# Altium PCB PCB1.PcbDoc
Units mm, origin at the board's own origin, x right, y up, seen from the top; angles counter-clockwise.
Board outline 130 x 71 mm, 2 copper layers (Top Layer, Bottom Layer); 54 components, 60 nets, 381 pads, 527 vias.
Unrouted connection lines stored in the file: 34.
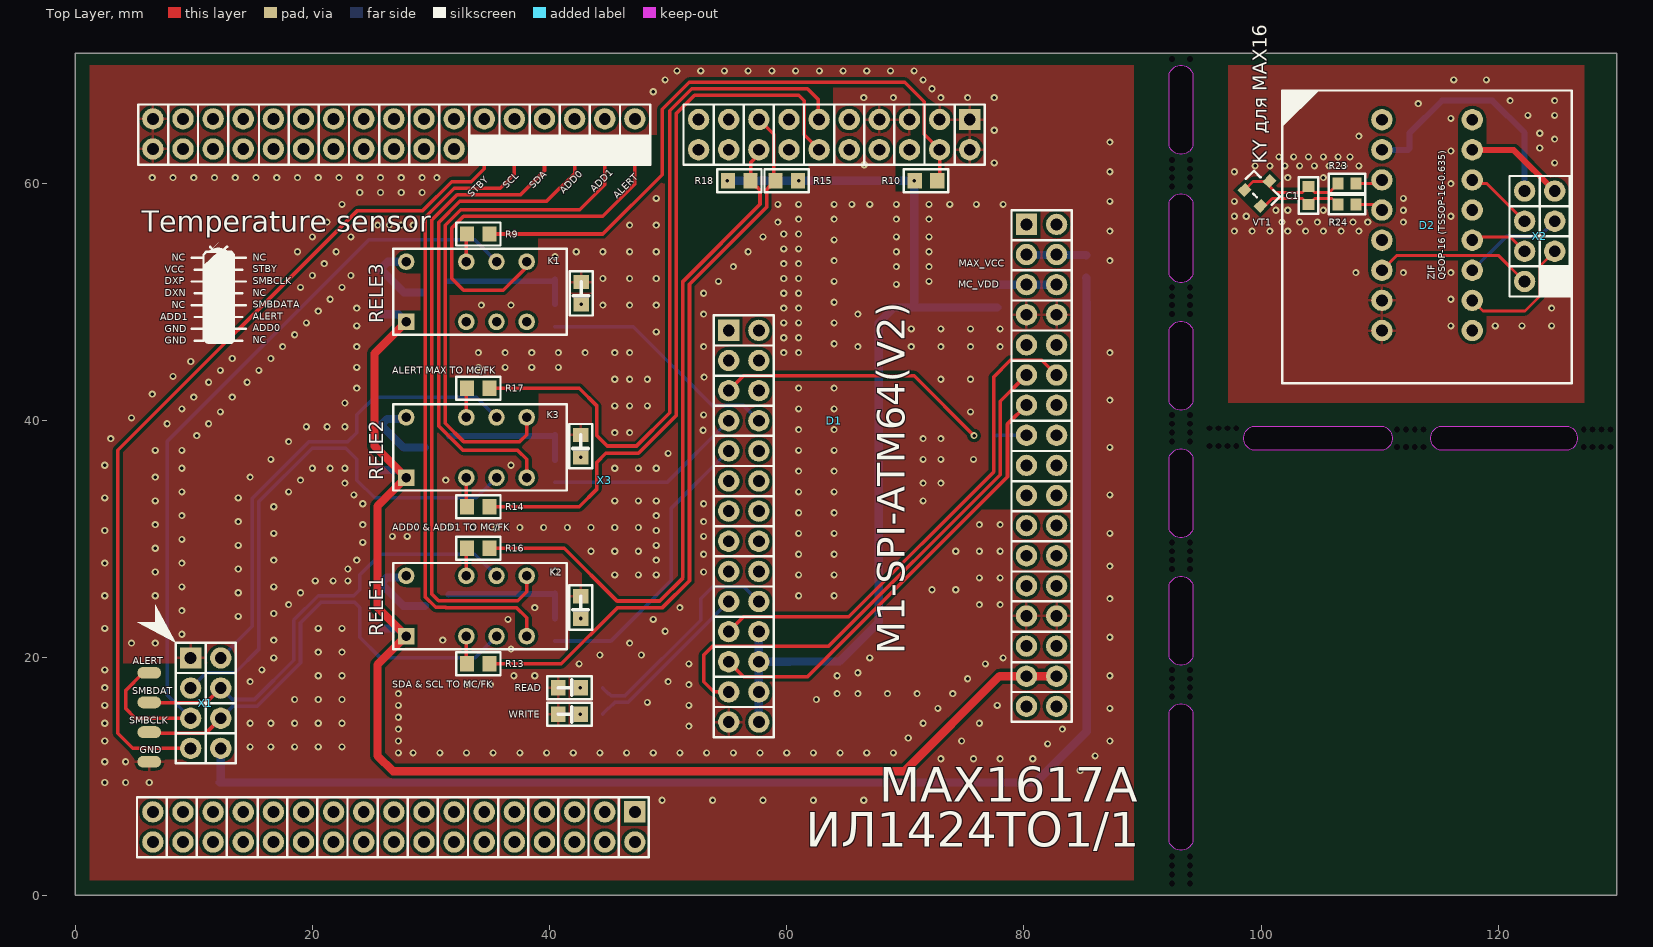
[diagram p0: Top Layer view]
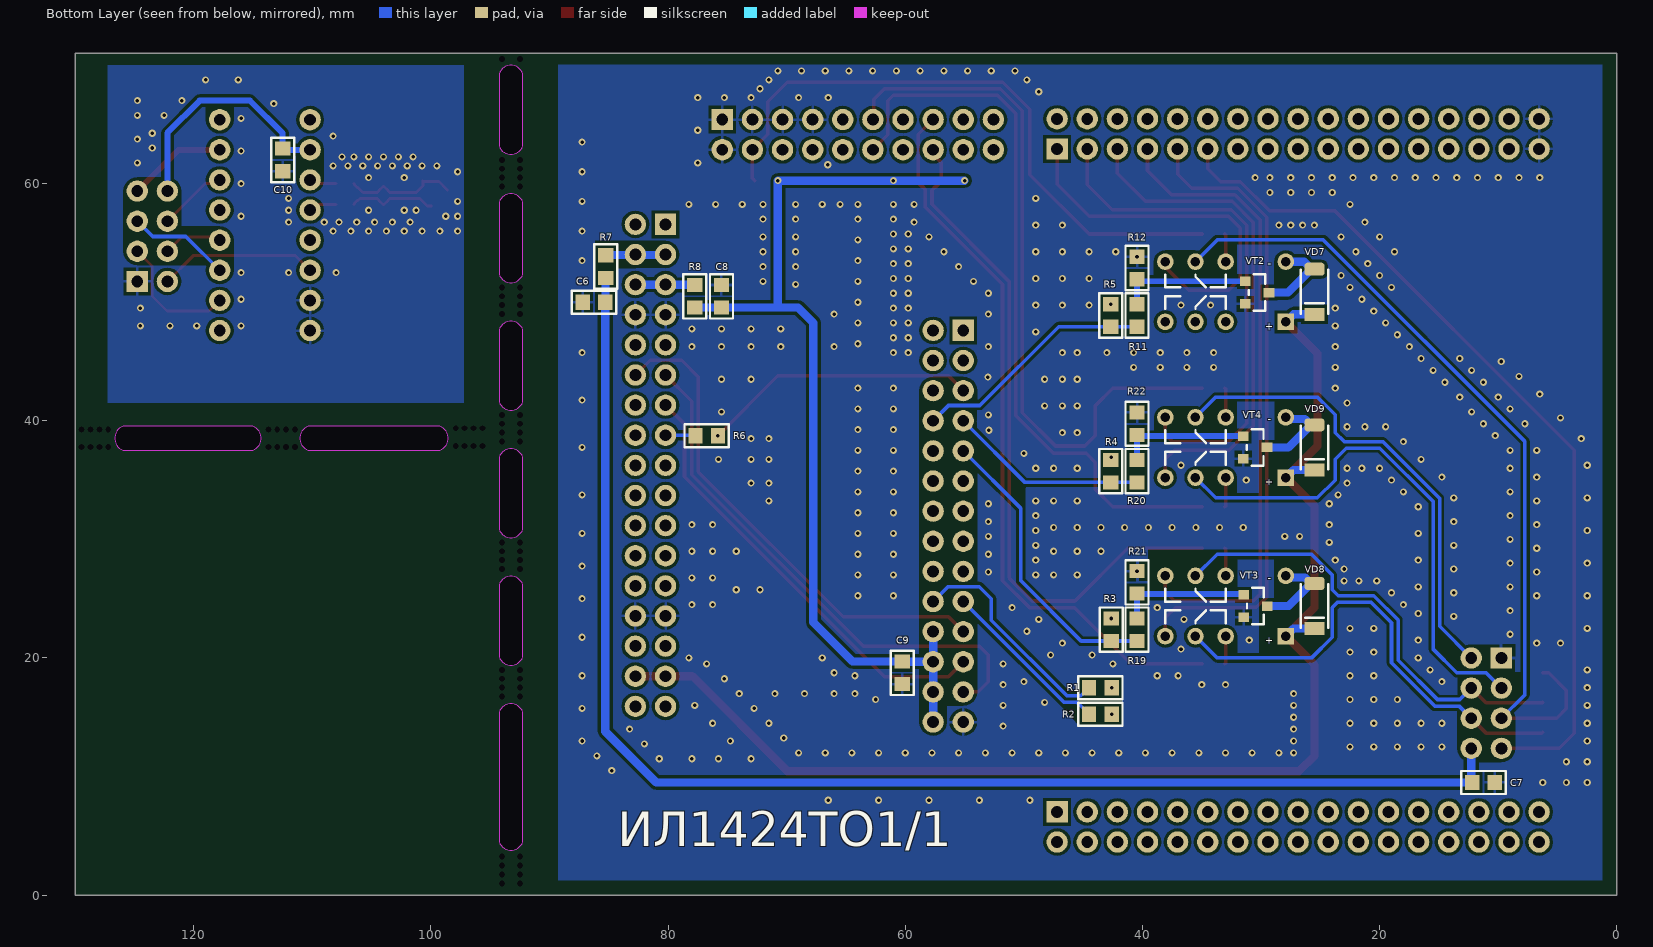
[diagram p1: Bottom Layer view, seen from below]

## Layer stack, top to bottom
Top Solder: solder mask 0.0102, Solder Resist, Dk 3.5
Top Layer: signal copper 0.0356
Dielectric 1: dielectric 0.32, FR-4, Dk 4.8
Bottom Layer: signal copper 0.0356
Bottom Solder: solder mask 0.0102, Solder Resist, Dk 3.5

## Board outline
0,0 130,0 130,71 0,71
cut-out: 110.349,39.522 cw(c110.007,38.522) 110.349,37.522 99.25,37.522 cw(c99.592,38.522) 99.25,39.522
cut-out: 125.957,39.522 cw(c125.615,38.522) 125.957,37.522 115.029,37.522 cw(c115.371,38.522) 115.029,39.522
cut-out: 94.25,4.5 cw(c93.25,4.842) 92.25,4.5 92.25,15.428 cw(c93.25,15.086) 94.25,15.428
cut-out: 94.25,20.108 cw(c93.25,20.45) 92.25,20.108 92.25,26.178 cw(c93.25,25.836) 94.25,26.178
cut-out: 94.25,30.858 cw(c93.25,31.2) 92.25,30.858 92.25,36.928 cw(c93.25,36.586) 94.25,36.928
cut-out: 94.25,41.608 cw(c93.25,41.95) 92.25,41.608 92.25,47.678 cw(c93.25,47.336) 94.25,47.678
cut-out: 94.25,52.358 cw(c93.25,52.7) 92.25,52.358 92.25,58.428 cw(c93.25,58.086) 94.25,58.428
cut-out: 94.25,63.18 cw(c93.25,63.522) 92.25,63.18 92.25,69.25 cw(c93.25,68.908) 94.25,69.25

## Design rules (kind name [scope] priority, off if disabled: settings)
Clearance [All] p1: gap=0.2 ignorepadtopadclearanceinfootprint=FALSE except(0: Arc-Hole Track-Hole SMDPad-Hole THPad-Hole Via-Hole Fill-Hole Poly-Hole Region-Hole Text-Hole; 0.254: Arc-Poly Track-Track Track-Poly SMDPad-Poly THPad-Poly Via-Poly Fill-Poly Poly-Poly)
ComponentClearance [All] p1: gap=0 collisioncheckmode=3 verticalgap=0 showdistances=FALSE
DiffPairsRouting [All] p1: maxlimit=0.254 minlimit=0.254 mostfreqgap=0.254 toplayer_minwidth=0.254 toplayer_maxwidth=0.254 toplayer_prefwidth=0.254 bottomlayer_minwidth=0.254 bottomlayer_maxwidth=0.254 bottomlayer_prefwidth=0.254 maxuncoupledlength=12.7
HoleToHoleClearance [All] p1: gap=0.2 allowstackedmicrovias=TRUE
PolygonConnect [All] p1: thpad.connectstyle=Relief thpad.reliefconductorwidth=0.254 thpad.reliefentries=4 thpad.polygonreliefangle="90 Angle" thpad.airgapwidth=0.254 smdpad.connectstyle=Relief smdpad.reliefconductorwidth=0.254 smdpad.reliefentries=4 smdpad.polygonreliefangle="90 Angle" smdpad.airgapwidth=0.254 via.connectstyle=Direct via.reliefconductorwidth=0.254 via.reliefentries=4 via.polygonreliefangle="90 Angle" via.airgapwidth=0.254
RoutingVias [All] p1: holewidth=0.3 width=0.6 viastyle="Through Hole" minholewidth=0.3 minwidth=0.6 maxholewidth=0.6 maxwidth=1.2
SilkToSilkClearance [All] p1: silktosilkclearance=0
SilkToSolderMaskClearance [IsPad] p1: minsilkscreentomaskgap=0 clearancetoexposedcopper=TRUE
SolderMaskExpansion [All] p1: expansion=0.102 istentingtop=FALSE
Width [All] p1: maxlimit=0.7 minlimit=0.254 preferedwidth=0.3
25 further rules are at their usual default settings.

## Classes and differential pairs
differential pair DX_MAX_KY: +DX_MAX_KY_P -DX_MAX_KY_N

## Components (designator, comment, footprint, x,y, rotation, side; value= is the part's Value field where it differs from the comment)
ALERT "Contact" Contact 6.25,18.75 r180 top (schematic designator KP3)
C1 "2200pF" 0603 104,59 r270 top
C6 "10uF" 0805 86.25,50 r0 bottom
C7 "0.1uF" 0805 11.25,9.5 r180 bottom
C8 "10uF" 0805 75.5,50.5 r90 bottom
C9 "0.1uF" 0805 60.25,18.75 r270 bottom
C10 "0.1uF" 0805 112.5,62 r270 bottom
D1 "M1-SPI-ATM64(V2)" M1-SPI-ATM64(V2) 64,40 r270 top locked
D2 "QSOP-16" "QSOP-16 to DIP-7.62" 114,56.5 r0 top locked
GND "Contact" Contact 6.25,11.25 r0 top (schematic designator KP4)
K1 "V23079A1001B301 TE" V23079A1001B301 34.21,50.88 r0 top locked
K2 "V23079A1001B301 TE" V23079A1001B301 34.21,24.38 r0 top locked
K3 "V23079A1001B301 TE" V23079A1001B301 34.21,37.75 r0 top locked
R1 "2.2k" 0805 43.55,17.5 r180 bottom
R2 "2.2k" 0805 43.55,15.25 r180 bottom
R3 "2.2k" 0805 42.627,22.38 r90 bottom
R4 "2.2k" 0805 42.674,35.75 r90 bottom
R5 "2.2k" 0805 42.674,48.88 r90 bottom
R6 "1" 0805 76.75,38.75 r0 bottom
R7 "1" 0805 85.25,53 r270 bottom
R8 "1" 0805 77.75,50.5 r270 bottom
R9 "100" 0805 34,55.75 r0 top
R10 "10k" 0805 71.75,60.25 r180 top
R11 "1k" 0805 40.46,48.88 r90 bottom
R12 "20k" 0805 40.46,52.88 r90 bottom
R13 "100" 0805 34,19.5 r0 top
R14 "100" 0805 34,32.75 r0 top
R15 "10k" 0805 60,60.25 r0 top
R16 "100" 0805 34,29.25 r0 top
R17 "100" 0805 34,42.75 r0 top
R18 "10k" 0805 56,60.25 r180 top
R19 "1k" 0805 40.46,22.38 r90 bottom
R20 "1k" 0805 40.46,35.75 r90 bottom
R21 "20k" 0805 40.46,26.38 r90 bottom
R22 "20k" 0805 40.46,39.75 r90 bottom
R23 "SOLDER" 0603 107.25,60 r0 top
R24 "SOLDER" 0603 107.25,58.25 r0 top
READ "LED(0805)" 0805(LED) 41.68,17.5 r180 top (schematic designator VD1)
RELE1 "LED(0805)" 0805(LED) 42.627,24.25 r90 top (schematic designator VD3)
RELE2 "LED(0805)" 0805(LED) 42.627,37.861 r90 top (schematic designator VD4)
RELE3 "LED(0805)" 0805(LED) 42.674,50.75 r90 top (schematic designator VD5)
SMBCLK "Contact" Contact 6.25,13.75 r180 top (schematic designator KP2)
SMBDAT "Contact" Contact 6.25,16.25 r180 top (schematic designator KP1)
VD7 "LL4148 NXP" SOD80C 25.5,50.88 r270 bottom
VD8 "LL4148 NXP" SOD80C 25.5,24.38 r270 bottom
VD9 "LL4148 NXP" SOD80C 25.5,37.75 r270 bottom
VT1 "MMBT3904L*G ONS" SOT-23#1 100,59.5 r315 top
VT2 "MMBT5551L" SOT-23#2 30.335,50.815 r270 bottom
VT3 "MMBT5551L" SOT-23#2 30.47,24.38 r270 bottom
VT4 "MMBT5551L" SOT-23#2 30.5,37.75 r270 bottom
WRITE "LED(0805)" 0805(LED) 41.68,15.25 r180 top (schematic designator VD2)
X1 "PLD8-2,54" PLD8-2,54 9.75,20 r270 top
X2 "PLD8-2,54" PLD8-2,54 124.75,51.75 r90 top
X3 "FORMULA" FORMULA 35.017,33.7 r0 top locked

## Footprints (in the part's own frame and the unit in brackets; to place one, negate y for a bottom-side part, rotate by r counter-clockwise, add the part's x,y. Pads: shape width x height; smd on the part's side, far side on the other; paste and mask are expansions set on the pad)
0603 [mm]
  rect 0.9x1 smd: 1(-0.76,0) 2(0.76,0)
  silkscreen extent -1.53,-0.82 1.53,0.82, body extent -0.8,-0.4 0.8,0.4, height 0.45
0805 [mm]
  rect 1.2x1.3 smd: 1(-0.95,0) 2(0.95,0)
  silkscreen extent -1.87,-0.97 1.87,0.97, body extent -1.05,-0.63 0.95,0.63, height 0.55
0805(LED) [mm]
  rect 1.2x1.3 smd: 1(-0.95,0) 2(0.95,0)
  silkscreen extent -1.87,-0.97 1.87,0.97, body extent -1.03,-0.41 1.03,0.5, height 0.85
Contact [mm]
  oval 2x1 smd: 1(0,0)
FORMULA [mm]
  rect 1.8x1.8 hole 1: 1(12.18,29.22) VDDF(12.18,-26.68) VEEF(45.2,22.86)
  round 1.8 hole 1: 2(9.64,29.22) 3(7.1,29.22) 4(4.56,29.22) 5(2.02,29.22) 6(-0.52,29.22) 7(-3.06,29.22) 8(-5.6,29.22) 9(-8.14,29.22) 10(-10.68,29.22) 11(-13.22,29.22) 12(-15.76,29.22) 13(-18.3,29.22) 14(-20.84,29.22) 15(-23.38,29.22) 16(-25.92,29.22) 17(12.18,31.76) 18(9.64,31.76) 19(7.1,31.76) 20(4.56,31.76) 21(2.02,31.76) 22(-0.52,31.76) 23(-3.06,31.76) 24(-5.6,31.76) 25(-8.14,31.76) 26(-10.68,31.76) 27(-13.22,31.76) 28(-15.76,31.76) 29(-18.3,31.76) 30(-20.84,31.76) 31(-23.38,31.76) 32(-25.92,31.76) 33(-28.46,-29.22) 34(-25.92,-29.22) 35(-23.38,-29.22) 36(-20.84,-29.22) 37(-18.3,-29.22) 38(-15.76,-29.22) 39(-13.22,-29.22) 40(-10.68,-29.22) 41(-8.14,-29.22) 42(-5.6,-29.22) 43(-3.06,-29.22) 44(-0.52,-29.22) 45(2.02,-29.22) 46(4.56,-29.22) 47(7.1,-29.22) 48(9.64,-29.22) 49(-28.46,-26.68) 50(-25.92,-26.68) 51(-23.38,-26.68) 52(-20.84,-26.68) 53(-18.3,-26.68) 54(-15.76,-26.68) 55(-13.22,-26.68) 56(-10.68,-26.68) 57(-8.14,-26.68) 58(-5.6,-26.68) 59(-3.06,-26.68) 60(-0.52,-26.68) 61(2.02,-26.68) 62(4.56,-26.68) 63(7.1,-26.68) 64(9.64,-26.68) +5V(45.2,-15.24) +5V(47.74,-15.24) +5V_VCCF(45.2,20.32) +5V_VCCS(47.74,20.32) +5V_VDDF(45.2,17.78) +5V_VDDS(47.74,17.78) +12V(45.2,-12.7) +12V(47.74,-12.7) -12V(45.2,-17.78) -12V(47.74,-17.78) GND(-28.46,29.22) GND(-28.46,31.76) GND(45.2,-10.16) GND(45.2,15.24) GND(47.74,-10.16) GND(47.74,15.24) IN-OUT1(47.74,10.16) IN-OUT2(47.74,7.62) IN-OUT3(47.74,5.08) IN-OUT4(47.74,2.54) IN-OUT5(47.74,0) IN-OUT6(47.74,-2.54) IN-OUT7(47.74,-5.08) IN-OUT8(47.74,-7.62) NC(45.2,12.7) NC(47.74,12.7) OUT1(45.2,10.16) OUT2(45.2,7.62) OUT3(45.2,5.08) OUT4(45.2,2.54) OUT5(45.2,0) OUT6(45.2,-2.54) OUT7(45.2,-5.08) OUT8(45.2,-7.62) VDDS(12.18,-29.22) VEES(47.74,22.86)
  silkscreen extent -29.8,-30.51 49.02,32.97, body extent -29.79,-30.4 48.98,32.92, height 3
M1-SPI-ATM64(V2) [mm]
  rect 1.8x1.8 hole 1: 1X2(-25.4,11.43) 1X3(-7.62,-8.89)
  round 1.8 hole 1: 2X2(-22.86,11.43) 2X3(-7.62,-6.35) 3X2(-25.4,8.89) 3X3(-5.08,-8.89) 4X2(-22.86,8.89) 4X3(-5.08,-6.35) 5X2(-25.4,6.35) 5X3(-2.54,-8.89) 6X2(-22.86,6.35) 6X3(-2.54,-6.35) 7X2(-25.4,3.81) 7X3(0,-8.89) 8X2(-22.86,3.81) 8X3(0,-6.35) 9X2(-25.4,1.27) 9X3(2.54,-8.89) 10X2(-22.86,1.27) 10X3(2.54,-6.35) 11X2(-25.4,-1.27) 11X3(5.08,-8.89) 12X2(-22.86,-1.27) 12X3(5.08,-6.35) 13X2(-25.4,-3.81) 13X3(7.62,-8.89) 14X2(-22.86,-3.81) 14X3(7.62,-6.35) 15X2(-25.4,-6.35) 15X3(10.16,-8.89) 16X2(-22.86,-6.35) 16X3(10.16,-6.35) 17X2(-25.4,-8.89) 17X3(12.7,-8.89) 18X2(-22.86,-8.89) 18X3(12.7,-6.35) 19X2(-25.4,-11.43) 19X3(15.24,-8.89) 20X2(-22.86,-11.43) 20X3(15.24,-6.35) 21X3(17.78,-8.89) 22X3(17.78,-6.35) 23X3(20.32,-8.89) 24X3(20.32,-6.35) 25X3(22.86,-8.89) 26X3(22.86,-6.35) 27X3(25.4,-8.89) 28X3(25.4,-6.35)
  silkscreen extent -26.67,-12.7 26.67,12.7
PLD8-2,54 [mm]
  rect 1.8x1.8 hole 1: 1(0,-0.01)
  round 1.8 hole 1: 2(0,2.53) 3(2.54,-0.01) 4(2.54,2.53) 5(5.08,-0.01) 6(5.08,2.53) 7(7.62,-0.01) 8(7.62,2.53)
  silkscreen extent -1.27,-1.28 8.89,3.8, body extent -1.27,-1.28 8.89,3.8, height 8.54
"QSOP-16 to DIP-7.62" [mm]
  round 1.8 hole 1: 1(-3.81,8.89) 2(-3.81,6.35) 3(-3.81,3.81) 4(-3.81,1.27) 5(-3.81,-1.27) 6(-3.81,-3.81) 7(-3.81,-6.35) 8(-3.81,-8.89) 9(3.81,-8.89) 10(3.81,-6.35) 11(3.81,-3.81) 12(3.81,-1.27) 13(3.81,1.27) 14(3.81,3.81) 15(3.81,6.35) 16(3.81,8.89)
  silkscreen extent -12.25,-13.35 12.2,11.35, body extent -5.06,-10.41 5.06,10.47, height 8.5
SOD80C [mm]
  rrect50% 1.1x1.7 smd: 1(-1.9,0)
  rect 1.1x1.7 smd: 2(1.9,0)
  silkscreen extent -1.85,-1.17 1.85,1.17, body extent -1.9,-0.8 1.8,0.8, height 1.55
SOT-23#1 [mm]
  rect 0.8x0.9 smd: 1(-0.95,-1) 2(0.95,-1) 3(0,1)
  silkscreen extent -1.55,-0.72 1.55,0.7
SOT-23#2 [mm]
  rect 0.8x0.9 smd: 1(-0.95,-1) 1(-0.95,-1) 2(0.95,-1) 2(0.95,-1) 3(0,1) 3(0,1)
  silkscreen extent -1.55,-0.72 1.55,0.7, body extent -1.5,-1.25 1.5,1.25, height 1.05
V23079A1001B301 [mm]
  rect 1.4x1.4 hole 0.8: 1(-6.3,-2.54)
  round 1.4 hole 0.8: 3(-1.22,-2.54) 4(1.32,-2.54) 5(3.86,-2.54) 8(3.86,2.54) 9(1.32,2.54) 10(-1.22,2.54) 12(-6.3,2.54)
  silkscreen extent -7.4,-3.63 7.25,3.63, body extent -7.25,-3.6 7.25,3.6, height 9.4

## Part data
C1: library part C0603, ComponentHeigt=1.3, Firme=AVX, KIND=Конденсатор, Leadform=SMD, Packaging=0805
C6 C7 C8 C9 C10: library part C0805, ComponentHeigt=1.3, Firme=AVX, KIND=Конденсатор, Leadform=SMD, Packaging=0805
D2: library part MAX1617
R1 R2 R3 R4 R5 R6 R7 R8 R9 R10 R11 R12 R13 R14 R15 R16 R17 R18 R19 R20 R21 R22: library part "R0805 Yageo", ComponentHeigt=0.6, Firme=Yageo, KIND=Резистор, Leadform=SMD, Packaging=0805
R23 R24: library part "R0603 Yageo", ComponentHeigt=0.5, Firme=Yageo, KIND=Резистор, Leadform=SMD, Packaging=0402
D1 X1 X2: ComponentHeigt=5.5, Name=Вилка, Specification="Вилка PLD2-2 *", Typ=PLD2-2
READ RELE1 RELE2 RELE3 WRITE: ComponentHeigt=0.75, Firme=Kingbright, KIND="Светодиод L-1154GD Kingbright", Leadform="в отверстия", NN=24003000
VD7 VD8 VD9: Component Link=http://www.nxp.com, ComponentHeigt=1.6, Firme=NXP, KIND="Диод LL4148 NXP", Leadform=SMD, NN=24009301, Packaging=SOD-80C
VT1: ComponentHeigt=1.1, Firme=ONS, KIND="Транзистор MMBT3904L*G ONS", Leadform=SMD, NN=24006226, Packaging=SOT-23
VT2 VT3 VT4: ComponentHeigt=1.1, Firme=ONS, KIND="Транзистор MMBT5551L*G ONS", Leadform=SMD, NN=24007468, Packaging=SOT-23

## Free pads (board coordinates)
  round 0 hole 0.5 unplated: 38(94,2.5) 38(94,18.25) 38(94,29) 38(94,39.75) 38(94,50.5) 38(94,61.25) 38(96.408,39.37) 38(112.207,39.272) 38(127.957,39.272) 39(94,3.25) 39(94,19) 39(94,29.75) 39(94,40.5) 39(94,51.25) 39(94,62) 39(95.658,39.37) 39(111.457,39.272) 39(127.207,39.272) 41(92.5,1.75) 41(92.5,2.5) 41(92.5,17.5) 41(92.5,18.25) 41(92.5,28.25) 41(92.5,29) 41(92.5,39) 41(92.5,39.75) 41(92.5,49.75) 41(92.5,50.5) 41(92.5,60.5) 41(92.5,61.25) 41(96.408,37.87) 41(97.158,37.87) 41(112.207,37.772) 41(112.957,37.772) 41(127.957,37.772) 41(128.707,37.772) 42(92.5,3.25) 42(92.5,19) 42(92.5,29.75) 42(92.5,40.5) 42(92.5,51.25) 42(92.5,62) 42(95.658,37.87) 42(111.457,37.772) 42(127.207,37.772) 43(92.5,1) 43(92.5,16.75) 43(92.5,27.5) 43(92.5,38.25) 43(92.5,49) 43(92.5,59.75) 43(92.5,70.5) 43(94,1) 43(94,1.75) 43(94,16.75) 43(94,17.5) 43(94,27.5) 43(94,28.25) 43(94,38.25) 43(94,39) 43(94,49) 43(94,49.75) 43(94,59.75) 43(94,60.5) 43(94,70.5) 43(97.158,39.37) 43(97.908,37.87) 43(97.908,39.37) 43(112.957,39.272) 43(113.707,37.772) 43(113.707,39.272) 43(128.707,39.272) 43(129.457,37.772) 43(129.457,39.272)

## Via types
v1: diameter 0.6, hole 0.3, Top Layer to Bottom Layer, tented both sides, 527 vias

## Nets (pads, with @x,y where several pads share a name; then routed paths per layer and width w, separated by ;. In a path a pad name is that pad's centre, name@x,y a point inside that pad or via, vN(x,y) a via of type N, cw(c..) or ccw(c..) an arc to the next point about the centre after c; other vN are vias at no path point)
+5V_CONST: K1.1 K2.1 K3.1 VD7.2 VD8.2 VD9.2 X3.+5V | length 110.9
  Top Layer w0.7: K1.1 25.25,45.68 25.25,37.87 K3.1 25.5,32.8 25.5,24.25 K2.1 25.5,19.43 25.5,11.75 26.796,10.454 69.954,10.454 77.96,18.46 80.217,18.46 X3.+5V@82.757,18.46
  Bottom Layer w0.7: VD8.2 27.27,22.48 K2.1 ; VD9.2 27.27,35.85 K3.1 ; VD7.2 27.27,48.98 K1.1
+5V_VCC: R7.1 X3.+5V_VCCF X3.+5V_VCCS | length 5.1
  Bottom Layer w0.7: X3.+5V_VCCF 80.252,53.985 85.215,53.985 R7.1
+5V_VDD: R8.1 X3.+5V_VDDF X3.+5V_VDDS | length 5
  Bottom Layer w0.7: R8.1 77.765,51.465 80.202,51.465 X3.+5V_VDDF X3.+5V_VDDS
A0_MC: D1.12X2 R14.2 | length 62
  Top Layer w0.3: R14.2 42.5,32.75 44,34.25 44,36.5 44.75,37.25 47.5,37.25 50.696,40.446 50.696,65.913 52.229,67.446 61.021,67.446 61.48,66.987 61.48,64.11 D1.12X2
A1_MC: D1.11X2 R17.2 | length 60.7
  Top Layer w0.3: R17.2 42.5,42.75 44,41.25 44,38.75 44.876,37.874 47.341,37.874 50.142,40.675 50.142,66.142 52,68 61.75,68 62.676,67.074 62.676,65.454 D1.11X2
ADD0_F: K3.5 X3.3 | length 42.5
  Top Layer w0.3: K3.5 38.07,36.75 37.32,37.5 32.717,37.5 30.642,39.575 30.642,56.709 32.433,58.5 39.75,58.5 42.117,60.867 X3.3
ADD0_MAX: K3.4 X1.3 | length 44.9
  Bottom Layer w0.3: X1.3 11.03,18.75 13.5,18.75 15.5,20.75 15.5,33.217 19.979,37.696 22.804,37.696 23.75,36.75 23.75,35 25.25,33.5 33.82,33.5 K3.4
ADD0_MAX_KY: D2.10 X2.3 | length 10.9
  Top Layer w0.254: D2.10 118.71,49.25 122.25,49.25 123.522,50.522 123.522,53.052 X2.3
ADD1_F: K3.8 X3.2 | length 43.8
  Top Layer w0.3: K3.8 38.07,38.82 37.5,38.25 32.75,38.25 31.196,39.804 31.196,56.479 32.521,57.804 42.554,57.804 44.657,59.907 X3.2
ADD1_MAX: K3.9 X1.2 | length 40.3
  Bottom Layer w0.3: X1.2 14.946,22.666 14.946,33.446 19.75,38.25 23,38.25 23.75,39 23.75,40.5 25.25,42 33.82,42 K3.9
ADD1_MAX_KY: D2.6 X2.2 | length 13.4
  Top Layer w0.254: D2.6 111.417,53.917 120.053,53.917 X2.2
ALERT_F: K1.8 X3.1 | length 32.2
  Top Layer w0.3: K1.8 37.86,53.21 37.86,52.752 36.108,51 32.75,51 31.75,52 31.75,56.25 32.75,57.25 44.5,57.25 47.197,59.947 X3.1
ALERT_MAX: ALERT.1 K1.9 X1.5 | length 69.7
  Top Layer w0.3: ALERT.1 5.75,18.75 4.25,17.25 4.25,15.75 5.08,14.92 X1.5
  Bottom Layer w0.3: X1.5 7.75,16.91 7.75,38.25 24.75,55.25 33.7,55.25 K1.9
ALERT_MAX_KY: D2.11 X2.5 | length 8.7
  Bottom Layer w0.3: D2.11 120.66,55.54 123.47,55.54 X2.5
ALERT_MC: D1.4X2 R9.2 R10.1 | length 53.1
  Top Layer w0.3: R9.2 44.5,55.75 49.5,60.75 49.5,66.283 51.771,68.554 69.946,68.554 71.6,66.9 71.6,64.15 D1.4X2 72.89,60.44 R10.1
DI1_MC: D1.21X3 X3.IN-OUT1 | length 42.3
  Top Layer w0.3: D1.21X3 56.36,23.47 65.229,23.47 77.446,35.687 77.446,43.696 78.86,45.11 81.507,45.11 X3.IN-OUT1
DO1_MC: D1.25X3 X3.OUT1 | length 45.3
  Top Layer w0.3: D1.25X3 53.86,17.14 53,18 53,20.25 53.72,20.97 63.513,20.97 78,35.457 78,41.643 X3.OUT1
DO2_MC: D1.23X3 X3.OUT2 | length 37.7
  Top Layer w0.3: D1.23X3 56.36,18.43 61.756,18.43 78.62,35.294 78.62,39.723 X3.OUT2
DX_MAX_KY_N: D2.4 R24.2 | length 2.4
  Top Layer w0.254: R24.2 109.71,58.25 D2.4
DX_MAX_KY_P: D2.3 R23.2 | length 2.3
  Top Layer w0.254: R23.2 109.88,60 D2.3
GND: C6.2 C7.2 C8.2 C9.2 D1.1X2 D1.2X2 D1.3X2 D1.5X2 D1.7X2 D1.27X3 GND.1 R12.2 R21.2 R22.2 READ.2 RELE1.2 RELE2.2 RELE3.2 VT2.2 VT3.2 VT4.2 WRITE.2 X1.1 X3.GND
  other v1: 49.5,8 53.75,8 58,8 62.25,8 66.5,8 2.5,9.5 4.25,9.5 6.25,9.5 84.75,10.5 2.5,11.25 4.25,11.25 73,11.5 75.75,11.5 78,11.5 80.75,11.5 86,11.75 27.25,12 28.5,12 30.75,12 33,12 35.25,12 37.5,12 39.75,12 42,12 44.25,12 46.5,12 48.75,12 51,12 53.25,12 55.5,12 57.75,12 60,12 62.25,12 64.5,12 66.75,12 69,12 14.75,12.5 16.5,12.5 18.5,12.5 20.5,12.5 22.5,12.5 82,12.75 2.5,13 27.25,13 74.75,13 87.25,13 70.25,13.25 27.25,14 83.25,14 51.75,14.25 2.5,14.5 14.75,14.5 16.5,14.5 18.5,14.5 20.5,14.5 22.5,14.5 71.5,14.5 76.25,14.5 27.25,15 72.75,15.75 87.25,15.75 2.5,16 27.25,16 51.75,16 77.75,16 48.25,16.25 18.5,16.5 20.5,16.5 22.5,16.5 62.5,16.5 27.25,17 64.25,17 66,17 68.5,17 71,17 74,17 2.5,17.5 33,17.75 35,17.75 51.75,17.75 14.75,18 50,18 75.25,18.25 20.5,18.5 22.5,18.5 37,18.5 38.75,18.5 64.25,18.5 87.25,18.5 66,18.75 2.5,19 15.75,19 42.5,19.5 51.75,19.5 76.75,19.5 16.75,20 67,20 78.25,20 44.25,20.25 47.75,20.25 20.5,20.5 22.5,20.5 36.75,20.75 4.75,21.25 6.75,21.25 46.75,21.25 16.75,21.5 31,21.5 87.25,21.75 9,22 49.75,22.25 2.5,22.5 20.5,22.5 22.5,22.5 36.5,23.25 48.75,23.25 13.75,23.5 16.75,23.75 9,24 38.75,24.25 51,24.25 18,24.5 76.25,24.5 78,24.5 87.25,25 2.5,25.25 6.75,25.25 61,25.25 64,25.25 13.75,25.5 19,25.5 72.25,25.75 74.25,25.75 9,26 16.75,26 20.25,26.5 21.75,26.5 23,26.5 76.25,26.75 78,26.75 45.5,27 47.5,27 49,27 61,27 64,27 6.75,27.25 53,27.25 40.46,27.33 13.75,27.5 23,27.5 87.25,27.75 2.5,28 9,28 16.75,28.25 23.75,28.25 49,28.25 53,28.75 61,28.75 64,28.75 43.5,29 45.5,29 47.5,29 74.25,29 76.25,29 78,29 6.75,29.25 13.75,29.5 49,29.5 24.25,29.75 9,30 26.75,30.25 28,30.25 53,30.25 16.75,30.5 61,30.5 64,30.5 87.25,30.5 2.5,30.75 49,30.75 31.5,31 33.5,31 35.5,31 37.5,31 39.5,31 41.5,31 43.5,31 45.5,31 47.5,31 6.75,31.25 24.25,31.25 76.25,31.25 78,31.25 13.75,31.5 53,31.5 9,32 49,32 61,32.25 64,32.25 16.75,32.75 24.25,33 53,33 6.75,33.25 45.5,33.25 47.5,33.25 49,33.25 71.5,33.25 2.5,33.5 13.75,33.5 23.5,33.75 87.25,33.75 9,34 18,34 61,34 64,34 22.75,34.75 71.5,34.75 73,34.75 19,35 31.25,35 6.75,35.25 14.75,35.25 61,35.75 64,35.75 9,36 20,36 21.5,36 22.75,36 45.5,36 47.5,36 49,36 2.5,36.25 36.75,36.25 16.5,36.75 71.5,36.75 73,36.75 75.75,36.75 50,37.25 6.75,37.5 9,37.5 61,37.5 64,37.5 87.25,37.75 18,38.25 3,38.5 71.5,38.5 73,38.5 10.25,38.75 45.5,39 46.75,39 52.955,39.205 61,39.25 64,39.25 19.5,39.5 21.25,39.5 22.75,39.5 7.75,39.75 11.25,39.75 4.75,40.25 53,40.5 12.25,40.75 75.5,40.75 9,41 61,41 64,41 45.5,41.25 46.75,41.25 48.25,41.25 22.75,41.5 87.25,41.75 10,42 13.25,42 6.5,42.25 23.75,42.75 61,42.75 64,42.75 11.25,43.25 14.5,43.25 45.5,43.5 46.75,43.5 48.25,43.5 73,43.5 75.5,43.5 53.037,43.68 8.25,43.75 12.25,44.25 15.5,44.25 23.75,44.5 34,44.5 36.25,44.5 38.5,44.5 40.75,44.5 9.75,45 13.25,45.25 16.5,45.25 34,45.75 36.25,45.75 38.5,45.75 40.75,45.75 43,45.75 45.5,45.75 46.75,45.75 59.75,45.75 61,45.75 87.25,45.75 17.5,46.25 23.75,46.25 53,46.25 66,46.25 70.5,46.25 73,46.25 75.5,46.25 78,46.25 64,46.5 59.75,47 61,47 18.5,47.25 49,47.5 70.5,47.75 73,47.75 75.5,47.75 78,47.75 23.75,48 19.5,48.25 59.75,48.25 61,48.25 64,48.25 53,49 66,49 20.5,49.25 23.75,49.5 59.75,49.5 61,49.5 34.25,49.75 36.75,49.75 44.5,49.75 46.75,49.75 49,49.75 64,50 21.5,50.25 53,50.75 59.75,50.75 61,50.75 19,51.25 22.5,51.25 69.25,51.5 54.25,51.75 64,51.75 72,51.75 44.5,52 46.75,52 49,52 59.75,52 61,52 20,52.25 23.25,52.25 55.5,53 69.25,53 72,53 21,53.25 59.75,53.25 61,53.25 64,53.5 87.25,53.5 40.46,53.83 18.75,54.25 22,54.25 42.25,54.25 44.5,54.25 46.75,54.25 49,54.25 56.75,54.25 69.25,54.25 72,54.25 59.75,54.5 61,54.5 64,55.25 20,55.5 23.25,55.5 58,55.5 69.25,55.5 72,55.5 59.75,55.75 61,55.75 87.25,56 25.5,56.5 26.5,56.5 27.5,56.5 28.5,56.5 46.75,56.5 49,56.5 21.25,56.75 59.25,56.75 61,57 64,57 69.25,57 72,57 22.5,58.25 59.25,58.25 61,58.25 64,58.25 65.5,58.25 67,58.25 69.25,58.25 72,58.25 73.75,58.25 76,58.25 78.25,58.25 87.25,58.5 49,58.75 24,59.25 25.75,59.25 27.5,59.25 29.25,59.25 6.5,60.5 8.25,60.5 10,60.5 11.75,60.5 13.5,60.5 15.25,60.5 17,60.5 18.75,60.5 20.5,60.5 22.25,60.5 24,60.5 25.75,60.5 27.5,60.5 29.25,60.5 30.5,60.5 87.25,61 66.54,61.59 77.5,61.75 87.25,63.5 77.5,64.5 66.5,67.25 69,67.25 73,67.25 75.25,67.25 77.5,67.25 48.75,67.75 72.25,68 49.75,68.75 71.5,68.75 50.75,69.5 52.75,69.5 54.75,69.5 56.75,69.5 58.75,69.5 60.75,69.5 62.75,69.5 64.75,69.5 66.75,69.5 68.75,69.5 70.75,69.5
GND_KY: C10.2 D2.7 D2.8 X2.1
  other v1: 116,48 119.75,48 122,48 124.5,48 124.5,49.5 116,50.25 108,52.5 112,52.5 116,52.5 97.75,56 99.25,56 100.75,56 102.25,56 103.75,56 105.25,56 106.75,56 108.25,56 101.75,56.75 103.25,56.75 104.75,56.75 106.25,56.75 107.75,56.75 109,56.75 112,56.75 97.75,57.25 98.75,57.25 116,57.25 101.25,57.75 102.25,57.75 105.25,57.75 112,57.75 97.75,58.5 112,58.75 116,60 102.25,60.5 105.25,60.5 97.75,61 99.5,61.5 100.75,61.5 102,61.5 103.25,61.5 104.5,61.5 105.75,61.5 107,61.5 108.25,61.5 124.75,61.75 101.5,62.25 102.75,62.25 104,62.25 105.25,62.25 106.5,62.25 107.5,62.25 116,62.75 123.5,63 124.75,63.75 108.25,64 123.5,64.25 116,65.5 122.5,65.75 124.75,65.75 113.25,66.75 121,67 124.75,67 116.25,68.75 119,68.75
NetC1_1: C1.1 R23.1 VT1.1 VT1.3 | length 9.6
  Top Layer w0.254: VT1.1 99.328,60.172 VT1.3@100.672,60.172 ; VT1.3 VT1.3@100.672,60.172 ; R23.1 106.49,59.95 106.167,59.627 106.117,59.627 105.748,59.258 104.522,59.258 104.373,59.407 104.373,59.437 104.05,59.76 103.95,59.76 103.627,59.437 103.627,59.407 103.478,59.258 101.232,59.258 100.672,59.818 VT1.3@100.672,60.172
NetC1_2: C1.2 R24.1 VT1.2 | length 7.5
  Top Layer w0.254: VT1.2 100.323,58.121 100.952,58.75 103.478,58.75 103.627,58.601 103.627,58.563 103.95,58.24 104.05,58.24 104.373,58.563 104.373,58.601 104.522,58.75 105.99,58.75 106.117,58.623 106.167,58.623 106.49,58.3 R24.1
NetK1_10: K1.10 R9.1 | length 2.4
  Top Layer w0.3: K1.10 32.99,55.69 R9.1
NetK1_12: K1.12 VD7.1 VT2.3 | length 7.1
  Bottom Layer w0.7: VD7.1@25.46,52.78 VD7.1@25.76,52.78 ; K1.12 26.37,53.42 25.96,53.01 25.96,52.98 VD7.1@25.76,52.78 ; VT2.3@29.335,50.815 27.725,50.815 VD7.1@25.76,52.78
NetK2_3: K2.3 R13.1 | length 2.4
  Top Layer w0.3: K2.3 32.99,19.56 R13.1
NetK2_10: K2.10 R16.1 | length 2.4
  Top Layer w0.3: K2.10 32.99,29.19 R16.1
NetK2_12: K2.12 VD8.1 VT3.3 | length 7.2
  Bottom Layer w0.7: VD8.1@25.47,26.28 VD8.1@25.77,26.28 ; K2.12@27.92,26.92 27.786,26.786 26.276,26.786 VD8.1@25.77,26.28 ; VT3.3@29.47,24.38 27.67,24.38 VD8.1@25.77,26.28
NetK3_3: K3.3 R14.1 | length 2.5
  Top Layer w0.3: K3.3 32.99,32.81 R14.1
NetK3_10: K3.10 R17.1 | length 2.5
  Top Layer w0.3: K3.10 32.99,42.69 R17.1
NetK3_12: K3.12 VD9.1 VT4.3 | length 7.2
  Bottom Layer w0.7: VD9.1 VD9.1@25.8,39.65 ; K3.12@27.95,40.29 27.816,40.156 26.306,40.156 VD9.1@25.8,39.65 ; VT4.3@29.5,37.75 27.7,37.75 VD9.1@25.8,39.65
NetR1_2: R1.2 READ.1
  other v1: 42.6,17.5
NetR2_2: R2.2 WRITE.1
  other v1: 42.6,15.25
NetR3_2: R3.2 RELE1.1
  other v1: 42.627,23.33
NetR4_2: R4.2 RELE2.1
  other v1: 42.627,36.911
NetR5_2: R5.2 RELE3.1
  other v1: 42.674,49.83
NetR11_2: R11.2 R12.1 VT2.1 | length 11.2
  Bottom Layer w0.5: VT2.1@31.385,51.765 40.295,51.765 R12.1 R11.2
NetR19_2: R19.2 R21.1 VT3.1 | length 11.1
  Bottom Layer w0.5: VT3.1@31.47,25.33 31.52,25.38 40.41,25.38 R21.1 R19.2
NetR20_2: R20.2 R22.1 VT4.1 | length 11.1
  Bottom Layer w0.5: VT4.1@31.5,38.7 40.36,38.7 R22.1 R20.2
nSTBY_MAX: X1.7 X3.6 | length 72.9
  Top Layer w0.3: X1.7 4.87,12.38 3.6,13.65 3.6,37.519 23.809,57.728 29.311,57.728 31.745,60.162 33.412,60.162 34.497,61.247 X3.6
nSTBY_MAX_KY: D2.15 X2.7 | length 8.4
  Top Layer w0.5: D2.15 117.835,62.825 121.305,62.825 X2.7
READ: D1.20X3 R1.1 | length 18.9
  Bottom Layer w0.3: R1.1 44.5,17.45 44.95,17 45,17 45.196,16.804 46.371,16.804 52.75,23.183 52.75,25 53.76,26.01 56.4,26.01 D1.20X3
RELE1: D1.9X3 R3.1 R19.1 | length 24.9
  Bottom Layer w0.3: R19.1 R3.1 45.18,21.43 50.25,26.5 50.25,32.6 D1.9X3
RELE2: D1.7X3 R4.1 R20.1 | length 16.8
  Bottom Layer w0.3: R20.1 R4.1 49.91,34.8 D1.7X3
RELE3: D1.8X3 R5.1 R11.1 | length 20.5
  Bottom Layer w0.3: R11.1 R5.1 47.07,47.93 53.71,41.29 56.36,41.29 D1.8X3
RST_IN: R6.2 X3.OUT3 | length 2.5
  Bottom Layer w0.3: R6.2 77.73,38.78 X3.OUT3
RST_MC: D1.5X3 R6.1 | length 23.3
  Top Layer w0.3: D1.5X3 56.36,43.79 70.76,43.79 v1(75.8,38.75)
SCL_F: K2.5 X3.5 | length 54
  Top Layer w0.3: X3.5 37.037,60.787 35.858,59.608 31.974,59.608 29.534,57.168 29.534,25.142 30.412,24.264 31.236,24.264 31.25,24.25 37.2,24.25 38.07,23.38 K2.5
SCL_MC: D1.15X2 R13.2 R15.1 | length 62.3
  Top Layer w0.3: R13.2 41,19.5 45.75,24.25 49.533,24.25 51.804,26.521 51.804,51.521 58.304,58.021 58.304,59.504 58.55,59.75 58.6,59.75 59.05,60.2 R15.1 58.9,60.4 58.9,64.15 D1.15X2
SDA_F: K2.8 X3.4 | length 54.5
  Top Layer w0.3: K2.8 38.07,25.57 37.318,24.818 30.641,24.818 30.088,25.371 30.088,56.938 32.204,59.054 37.554,59.054 39.577,61.077 X3.4
SDA_MC: D1.16X2 R16.2 R18.1 | length 58.4
  Top Layer w0.3: R16.2 41.25,29.25 45.696,24.804 49.304,24.804 51.25,26.75 51.25,51.75 57.75,58.25 57.75,59.45 57.45,59.75 57.4,59.75 56.95,60.2 R18.1 56.95,61.754 57.65,62.454 D1.16X2
SMBCLK_MAX: K2.4 SMBCLK.1 X1.6 | length 40
  Top Layer w0.3: SMBCLK.1 6.33,13.67 11.03,13.67 X1.6
  Bottom Layer w0.3: X1.6 13.306,15.946 15.354,15.946 19,19.592 19,22.967 20.729,24.696 23.554,24.696 24,24.25 24,21.75 25.75,20 26,20 33.69,20 K2.4
SMBCLK_MAX_KY: D2.14 X2.6 | length 5.9
  Top Layer w0.254: D2.14 118.106,60.014 119.036,60.014 X2.6
SMBDAT_MAX: K2.9 SMBDAT.1 X1.4 | length 38.8
  Top Layer w0.3: SMBDAT.1 6.29,16.21 11.03,16.21 X1.4
  Bottom Layer w0.3: X1.4 13.24,16.5 15.124,16.5 18.446,19.822 18.446,23.196 20.5,25.25 23.5,25.25 24,25.75 24,27 25.75,28.75 33.7,28.75 K2.9
SMBDAT_MAX_KY: D2.12 X2.4 | length 5
  Top Layer w0.254: D2.12 118.08,55.5 121.01,55.5 X2.4
VCC_MAX: C6.1 C7.1 R7.2 X1.8 | length 116.1
  Bottom Layer w0.7: X1.8 12.28,9.58 C7.1 81,9.5 85.3,13.8 C6.1 85.275,50.025 85.275,52.025 R7.2
VCC_MAX_KY: C10.1 D2.2 X2.8 | length 20.5
  Bottom Layer w0.5: D2.2 112.4,62.85 C10.1 112.5,64.25 115.25,67 119.5,67 122.22,64.28 X2.8
VCC_MC: C8.1 C9.1 D1.22X3 D1.24X3 D1.26X3 D1.28X3 R8.2 R10.2 R15.2 R18.2 | length 81.3
  Bottom Layer w0.7: v1(55,60.25) v1(61,60.25) 70.5,60.25 v1(70.75,60.25) 70.75,49.55 ; D1.28X3 D1.26X3 D1.24X3 ; D1.22X3 D1.24X3 ; R8.2 C8.1 70.75,49.55 ; D1.24X3 57.66,19.69 60.24,19.69 C9.1 64.45,19.7 67.75,23 67.75,48.25 69.05,49.55 70.75,49.55
WRITE: D1.19X3 R2.1 | length 14.6
  Bottom Layer w0.3: R2.1 44.5,15.3 44.95,15.75 45,15.75 45.5,16.25 46.6,16.25 D1.19X3
pads on no net: D1.1X3 D1.2X3 D1.3X3 D1.4X3 D1.6X2 D1.6X3 D1.8X2 D1.9X2 D1.10X2 D1.10X3 D1.11X3 D1.12X3 D1.13X2 D1.13X3 D1.14X2 D1.14X3 D1.15X3 D1.16X3 D1.17X2 D1.17X3 D1.18X2 D1.18X3 D1.19X2 D1.20X2 D2.1 D2.5 D2.9 D2.13 D2.16 K1.3 K1.4 K1.5 X3.7 X3.8 X3.9 X3.10 X3.11 X3.12 X3.13 X3.14 X3.15 X3.16 X3.17 X3.18 X3.19 X3.20 X3.21 X3.22 X3.23 X3.24 X3.25 X3.26 X3.27 X3.28 X3.29 X3.30 X3.31 X3.32 X3.33 X3.34 X3.35 X3.36 X3.37 X3.38 X3.39 X3.40 X3.41 X3.42 X3.43 X3.44 X3.45 X3.46 X3.47 X3.48 X3.49 X3.50 X3.51 X3.52 X3.53 X3.54 X3.55 X3.56 X3.57 X3.58 X3.59 X3.60 X3.61 X3.62 X3.63 X3.64 X3.+12V X3.-12V X3.IN-OUT2 X3.IN-OUT3 X3.IN-OUT4 X3.IN-OUT5 X3.IN-OUT6 X3.IN-OUT7 X3.IN-OUT8 X3.NC X3.OUT4 X3.OUT5 X3.OUT6 X3.OUT7 X3.OUT8 X3.VDDF X3.VDDS X3.VEEF X3.VEES

## Polygon pours and split planes (outlines as drawn)
GND on Bottom Layer "NONET_L-01_P-001" (solid, remove dead copper, pour order 2): 1.25,70.003 1.25,1.25 89.25,1.25 89.25,70.003
GND_KY on Bottom Layer "NONET_L-01_P-001" (solid, remove dead copper, pour order 0): 97.25,70 97.25,41.5 127.25,41.5 127.25,70
GND on Top Layer "NONET_L-01_P-001" (solid, remove dead copper, pour order 3): 1.25,70 1.25,1.25 89.25,1.25 89.25,70
GND_KY on Top Layer "NONET_L-01_P-001" (solid, remove dead copper, pour order 1): 97.25,70 97.25,41.5 127.25,41.5 127.25,70

## Other copper
Top Layer:
  pour cut-out: 7.297,11.447 9.74,11.447 9.74,12.457
  pour cut-out: 4.579,12.089 5.015,12.089 5.015,11.447
  pour cut-out: 6.25,19.5 13.25,19.5 13.25,17.743
  pour cut-out: 12.28,18.624 9.74,18.624 9.74,17.46
  pour cut-out: 13.444,12.38 13.444,20 12.28,20
  pour cut-out: 9.74,11.216 12.28,11.216 12.28,12.38
  pour cut-out: 6.25,19.5 3.75,19.5 3.75,18.5
  pour cut-out: 57.65,41.376 55.11,41.376 55.11,42.54
  pour cut-out: 58.814,45.08 58.814,42.54 57.65,42.54
  pour cut-out: 55.11,46.244 57.65,46.244 57.65,45.08
  pour cut-out: 53.946,45.08 53.946,42.54 55.11,42.54
  pour cut-out: 58.774,25.061 58.774,22.22 57.65,22.22
  pour cut-out: 55.11,25.924 57.65,25.924 57.65,24.76
  pour cut-out: 53.946,22.22 53.946,19.68 55.11,19.68
  pour cut-out: 53.946,24.76 53.946,22.22 55.11,22.22
  pour cut-out: 55.11,15.976 57.65,15.976 57.65,17.14
  pour cut-out: 80.217,32.536 75.75,32.536 75.75,34
  pour cut-out: 82.757,32.536 80.217,32.536 80.217,33.7
  pour cut-out: 83.921,36.24 83.921,33.7 82.757,33.7
  pour cut-out: 83.921,46.4 83.921,36.24 82.757,36.24
  pour cut-out: 80.217,47.564 82.757,47.564 82.757,46.4
  pour cut-out: 79.053,46.4 79.053,43.86 80.217,43.86
  pour cut-out: 69.186,62.86 69.186,59.346 73.554,59.346
  pour cut-out: 70.554,64.285 70.554,62.893 72.967,62.893
  pour cut-out: 74.037,65.273 74.037,62.86 72.89,62.86
  pour cut-out: 72.763,64.253 72.763,60.25 70.8,60.25
  pour cut-out: 72.763,66.547 71.891,66.547 71.891,67.191
  pour cut-out: 69.946,61.154 73.554,61.154 73.554,59.346 69.946,59.346
  pour cut-out: 70.477,66.547 70.477,67.5 71,67.5
  pour cut-out: 61.804,61.154 61.804,62.86 60.19,62.86
  pour cut-out: 61.804,61.154 61.804,59.346 58.729,59.346
  pour cut-out: 63.894,65.4 63.894,61.696 60.19,61.696
  pour cut-out: 63.894,65.4 63.894,68.5 62.5,68.5
  pour cut-out: 41.723,22.813 41.723,20.75 42.364,20.75
  pour cut-out: 42.754,25.867 43.531,25.867 43.531,22.78
  pour cut-out: 42.754,25.867 42.754,27.25 43.617,27.25
  pour cut-out: 41.723,24.592 41.723,23.33 42.846,23.33
  pour cut-out: 41.723,38.109 41.723,36.911 42.759,36.911
  pour cut-out: 39.032,40.29 39.032,42.75 37.75,42.75
  pour cut-out: 32.946,43.654 31,43.654 31,42.59
  pour cut-out: 32.196,43.654 35.804,43.654 35.804,41.846 32.196,41.846
  pour cut-out: 32.196,33.654 35.804,33.654 35.804,31.846 32.196,31.846
  pour cut-out: 32.196,30.154 35.804,30.154 35.804,28.346 32.196,28.346
  pour cut-out: 37.108,21.84 37.108,24.01 37.44,24.01
  pour cut-out: 32.196,20.404 32.196,18.596 35.804,18.596 35.804,20.404
  pour cut-out: 27.91,27.882 29.5,27.882 29.5,25.958 27.91,25.958
  pour cut-out: 27.827,36.164 29.5,36.164 29.5,34.256 27.827,34.256
  pour cut-out: 27.91,41.252 29.5,41.252 29.5,39.328 27.91,39.328
  pour cut-out: 28.373,47.386 29.5,47.386 29.5,48.474
  pour cut-out: 28.364,49.294 29.5,49.294 29.5,48.769
  pour cut-out: 27.91,52.458 29.5,52.458 29.5,53.75
  pour cut-out: 27.91,54.382 29.5,54.382 29.5,53.75
  pour cut-out: 32.75,50.588 31.25,50.588 31.25,51.75
  pour cut-out: 39.032,53.42 39.032,55.75 35.87,55.75
  pour cut-out: 34.397,64.084 50.192,64.084 50.192,59.858
  pour cut-out: 118.974,47.61 118.974,50.15 117.81,50.15
  pour cut-out: 116.646,50.15 116.646,47.61 117.81,47.61
  pour cut-out: 116.646,52.69 116.646,50.15 117.81,50.15
  pour cut-out: 125.924,59.37 125.924,52.904 124.633,52.904
  pour cut-out: 118.974,65.39 118.974,62.825 117.835,62.825
  pour cut-out: 116.646,65.39 116.646,62.825 117.835,62.825
  pour cut-out: 116.646,62.85 116.646,60.31 117.81,60.31
  pour cut-out: 116.646,60.31 116.646,55.23 117.81,55.23
  pour cut-out: 116.646,55.23 116.646,52.69 117.81,52.69
  pour cut-out: 111.354,55.23 111.354,52.69 110.19,52.69
  pour cut-out: 109.026,55.23 109.026,52.69 110.19,52.69
  pour cut-out: 97.661,59.429 99.929,59.429 99.929,57.161
  pour cut-out: 111.354,60.31 111.354,57.77 110.19,57.77
Bottom Layer:
  pour cut-out: 86.154,55.184 86.154,49.096 84.455,49.096 84.455,55.184
  pour cut-out: 82.733,52.856 86.154,52.856 86.154,55.184
  pour cut-out: 82.757,55.184 86.154,55.184 86.154,51.196
  pour cut-out: 80.217,52.856 82.733,52.856 82.733,53.985
  pour cut-out: 80.217,55.184 82.757,55.184 82.757,54.02
  pour cut-out: 49.838,32.6 49.838,34.8 49.91,34.8
  pour cut-out: 43.578,50.684 39.556,50.684 39.556,47.076 43.578,47.076
  pour cut-out: 39.556,52.784 41.364,52.784 41.364,47.076 39.556,47.076
  pour cut-out: 39.032,53.42 39.032,51.765 38.07,51.765
  pour cut-out: 35.53,54.382 38.07,54.382 38.07,53.42
  pour cut-out: 32.028,53.42 32.028,51.765 32.99,51.765
  pour cut-out: 32.028,53.42 32.028,55.25 33.7,55.25
  pour cut-out: 28.872,53.42 28.872,50.815 27.725,50.815
  pour cut-out: 53.946,40 53.946,27.3 55.11,27.3
  pour cut-out: 58.814,40 58.814,27.3 57.65,27.3
  pour cut-out: 58.814,42.54 58.814,40 57.65,40
  pour cut-out: 55.11,43.704 57.65,43.704 57.65,42.54
  pour cut-out: 53.946,42.54 53.946,40 55.11,40
  pour cut-out: 43.578,37.554 39.556,37.554 39.556,33.946 43.578,33.946
  pour cut-out: 39.556,39.654 41.364,39.654 41.364,33.946 39.556,33.946
  pour cut-out: 39.032,40.29 39.032,38.7 38.07,38.7
  pour cut-out: 35.53,41.252 38.07,41.252 38.07,40.29
  pour cut-out: 32.99,36.172 35.53,36.172 35.53,35.21
  pour cut-out: 32.028,35.21 32.028,33.5 33.82,33.5
  pour cut-out: 28.872,40.29 28.872,42 26.5,42
  pour cut-out: 30.204,38.404 30.204,33.5 27.25,33.5
  pour cut-out: 32.028,40.29 32.028,38.66 32.99,38.66
  pour cut-out: 32.028,40.29 32.028,42 33.82,42
  pour cut-out: 28.872,40.29 28.872,37.75 27.7,37.75
  pour cut-out: 9.74,11.216 12.28,11.216 12.28,12.38
  pour cut-out: 8.576,14.92 8.576,12.38 9.74,12.38
  pour cut-out: 13.444,17.46 13.444,12.38 12.28,12.38
  pour cut-out: 13.444,17.46 13.444,20 12.28,20
  pour cut-out: 10.585,21.154 12.28,21.154 12.28,19.743
  pour cut-out: 9.613,18.846 7.75,18.846 7.75,17.75
  pour cut-out: 32.99,22.802 35.53,22.802 35.53,21.84
  pour cut-out: 32.028,26.92 32.028,28.75 33.7,28.75
  pour cut-out: 32.028,26.92 32.028,25.38 32.99,25.38
  pour cut-out: 32.028,21.84 32.028,20 33.69,20
  pour cut-out: 30.174,25.034 30.174,20 25.75,20
  pour cut-out: 28.872,26.92 28.872,28.75 25.75,28.75
  pour cut-out: 28.872,26.92 28.872,24.38 27.67,24.38
  pour cut-out: 33.7,29.162 39.556,29.162 39.556,25.894
  pour cut-out: 43.531,24.184 39.556,24.184 39.556,20.576 43.531,20.576
  pour cut-out: 39.556,26.284 41.364,26.284 41.364,20.576 39.556,20.576
  pour cut-out: 45.354,14.346 45.354,15.959 46.891,15.959
  pour cut-out: 41.746,18.404 45.354,18.404 45.354,14.346 41.746,14.346
  pour cut-out: 56.486,14.6 56.486,17.14 57.65,17.14
  pour cut-out: 55.11,15.976 57.65,15.976 57.65,17.14
  pour cut-out: 53.946,27.3 53.946,17.14 55.11,17.14
  pour cut-out: 58.814,27.3 58.814,22.22 57.65,22.22
  pour cut-out: 55.11,28.464 57.65,28.464 57.65,27.3
  pour cut-out: 53.946,27.3 53.946,24.76 55.11,24.76
  pour cut-out: 58.814,14.6 58.814,22.22 57.65,22.22
  pour cut-out: 74.946,39.654 78.554,39.654 78.554,37.846 74.946,37.846
  pour cut-out: 84.346,54.804 86.154,54.804 86.154,51.196 84.346,51.196
  pour cut-out: 118.974,65.39 118.974,67 117.75,67
  pour cut-out: 116.646,65.39 116.646,67 117.75,67
  pour cut-out: 117.81,56.394 122.22,56.394 122.22,54.29
  pour cut-out: 124.76,60.534 122.22,60.534 122.22,59.37
  pour cut-out: 125.924,59.37 125.924,54.29 124.76,54.29
  pour cut-out: 121.056,59.37 121.056,54.29 122.22,54.29
  pour cut-out: 122.22,57.994 124.76,57.994 124.76,56.83
  pour cut-out: 125.924,54.29 125.924,56.83 124.76,56.83
  pour cut-out: 122.22,53.126 124.76,53.126 124.76,54.29
  pour cut-out: 122.22,53.126 117.81,53.126 117.81,55.23
  pour cut-out: 116.646,55.23 116.646,52.69 117.81,52.69
  pour cut-out: 111.354,60.31 111.354,62.85 110.19,62.85
  pour cut-out: 109.026,62.85 109.026,60.31 110.19,60.31

## Silkscreen, mask and mechanical layers (free items; w line width, h text height)
Top Overlay:
  region: 123.522,53.02 123.522,50.48 126.03,50.48 126.03,53.02
  region: 48.487,61.59 33.247,61.59 33.247,64.13 48.487,64.13
  region: 8.47,21.27 6.75,22.99 6.75,24.5
  region: 8.47,21.27 6.74,23 5.25,23
  region: 10.823,53.116 12.1,54.3 13.1,54.3 13.395,54.005 13.395,46.785 cw(c13.11,46.785) 13.11,46.5 11.252,46.5 cw(c11.252,46.888) 10.864,46.885
  region: 11.313,54.266 12.063,55.016
  region: 11.313,54.266 cw(c11.917,53.663) 11.917,54.516 12.209,54.516 cw(c12.209,53.663) 12.813,54.266
  lines w0.2: 9.823,47.75 10.823,47.75 ; 9.823,49.75 10.823,49.75 ; 9.823,51.75 10.823,51.75 ; 9.823,53.75 10.823,53.75 ; 10.075,46.75 10.823,46.75 ; 10.075,48.75 10.823,48.75 ; 10.075,50.75 10.823,50.75 ; 10.075,52.75 10.823,52.75 ; 10.858,46.75 10.823,54.005 11.068,54.266 13.134,54.266 13.395,54.005 13.36,46.75 ; 11.313,54.266 cw(c12.063,53.266) 12.813,54.266 ; 11.383,54.66 11.579,54.463 ; 12.598,54.475 12.812,54.688 ; 13.395,46.75 14.075,46.75 ; 13.395,47.75 14.395,47.75 ; 13.395,48.75 14.075,48.75 ; 13.395,49.75 14.395,49.75 ; 13.395,50.75 14.075,50.75 ; 13.395,51.75 14.395,51.75 ; 13.395,52.75 14.075,52.75 ; 13.395,53.75 14.395,53.75
  text "KY для MAX1617A" at 100.921,61.693 h2 r90
  text "SCL" at 36.397,59.51 h0.6 r45
  text "SDA" at 38.647,59.51 h0.6 r45
  text "ADD1" at 43.755,59.228 h0.6 r45
  text "ADD0" at 41.184,59.086 h0.6 r45
  text "STBY" at 33.435,58.798 h0.6 r45
  text "ALERT" at 45.722,58.662 h0.6 r45
  text "Temperature sensor" at 5.628,55.356 h3
  text "NC" at 8.163,53.5 h0.6
  text "NC" at 14.974,53.505 h0.6
  text "MAX_VCC" at 74.5,52.782 h1
  text "VCC" at 7.563,52.5 h0.6
  text "STBY" at 14.974,52.505 h0.6
  text "DXP" at 7.563,51.5 h0.6
  text "SMBCLK" at 14.974,51.505 h0.6
  text "MC_VDD" at 74.482,51.003 h1
  text "NC" at 14.974,50.505 h0.6
  text "DXN" at 7.563,50.5 h0.6
  text "SMBDATA" at 14.974,49.532 h0.6
  text "NC" at 8.163,49.483 h0.6
  text "ALERT" at 14.974,48.532 h0.6
  text "ADD1" at 7.163,48.483 h0.6
  text "ADD0" at 14.974,47.532 h0.6
  text "GND" at 7.563,47.483 h0.6
  text "NC" at 14.974,46.532 h0.6
  text "GND" at 7.563,46.483 h0.6
  text "ALERT MAX TO MC/FK" at 26.75,43.97 h0.6
  text "ADD0 & ADD1 TO MC/FK" at 26.75,30.72 h0.6
  text "M1-SPI-ATM64(V2)" at 70.77,20.335 h4 r90
  text "SDA & SCL TO MC/FK" at 26.75,17.47 h0.6
  text "MAX1617A" at 67.788,6.919 h5
  text "ИЛ1424ТО1/1" at 61.621,3.126 h5
Bottom Overlay:
  text "ИЛ1424ТО1/1" at 84.248,3.169 h5
Mechanical 2:
  lines w0.2: 95.25,59.965 ccw(c95.984,59.965) 95.984,59.231 96.518,59.25 ccw(c96.518,59.965) 97.233,59.965 97.233,66 ccw(c96.483,66) 96.483,66.75 96,66.75 ccw(c96,66) 95.25,66 95.25,59.965
Board:
  lines w0.2: 0,0 130,0 130,71 0,71 0,0 ; 92.25,4.757 ccw(c93.222,4.757) 93.222,3.785 ccw(c93.222,4.813) 94.25,4.813 94.25,15.143 ccw(c93.25,15.143) 93.25,16.143 ccw(c93.25,15.143) 92.25,15.143 92.25,4.757 ; 92.25,20.393 ccw(c93.25,20.393) 93.25,19.393 ccw(c93.25,20.393) 94.25,20.393 94.25,25.846 ccw(c93.203,25.846) 93.203,26.893 ccw(c93.203,25.94) 92.25,25.94 92.25,20.393 ; 92.264,31.202 ccw(c93.264,31.202) 93.264,30.202 ccw(c93.264,31.202) 94.264,31.202 94.264,36.655 ccw(c93.217,36.655) 93.217,37.702 ccw(c93.217,36.749) 92.264,36.749 92.264,31.202 ; 92.264,41.952 ccw(c93.264,41.952) 93.264,40.952 ccw(c93.264,41.952) 94.264,41.952 94.264,47.405 ccw(c93.217,47.405) 93.217,48.452 ccw(c93.217,47.499) 92.264,47.499 92.264,41.952 ; 92.264,52.702 ccw(c93.264,52.702) 93.264,51.702 ccw(c93.264,52.702) 94.264,52.702 94.264,58.155 ccw(c93.217,58.155) 93.217,59.202 ccw(c93.217,58.249) 92.264,58.249 92.264,52.702 ; 92.264,63.452 ccw(c93.264,63.452) 93.264,62.452 ccw(c93.264,63.452) 94.264,63.452 94.264,68.905 ccw(c93.217,68.905) 93.217,69.952 ccw(c93.217,68.999) 92.264,68.999 92.264,63.452 ; 98.535,38.185 ccw(c99.25,38.185) 99.25,37.47 110.153,37.47 ccw(c110.153,38.442) 111.126,38.442 ccw(c110.098,38.442) 110.098,39.47 99.25,39.47 ccw(c99.25,38.755) 98.535,38.755 98.535,38.185 ; 114.268,38.47 cw(c115.268,38.47) 115.268,39.47 125.598,39.47 cw(c125.598,38.442) 126.626,38.442 cw(c125.653,38.442) 125.653,37.47 115.268,37.47 cw(c115.268,38.47) 114.268,38.47

## Dimensions
130,0 to 0,0 on Dimension
130,71 to 130,0 on Dimension

## Text inside footprints (layer, text, board x,y; h text height)
D2: Top Overlay "ZIF / QSOP-16 (TSSOP-16-0.635)" at 115.53,51.901 h0.6 r90
K1: Bottom Overlay "-" at 29.14,52.99 h0.6; Bottom Overlay "+" at 28.99,47.68 h0.6
K2: Bottom Overlay "-" at 29.14,26.49 h0.6; Bottom Overlay "+" at 28.99,21.18 h0.6
K3: Bottom Overlay "-" at 29.14,39.86 h0.6; Bottom Overlay "+" at 28.99,34.55 h0.6